# Altium PCB esp32s3.PcbDoc (part 3 of 3)
Units mm, origin at the board's own origin, x right, y up, seen from the top; angles counter-clockwise.
Board outline 131.57 x 101.6 mm, 2 copper layers (Top Layer, Bottom Layer); 173 components, 144 nets, 578 pads, 813 vias.
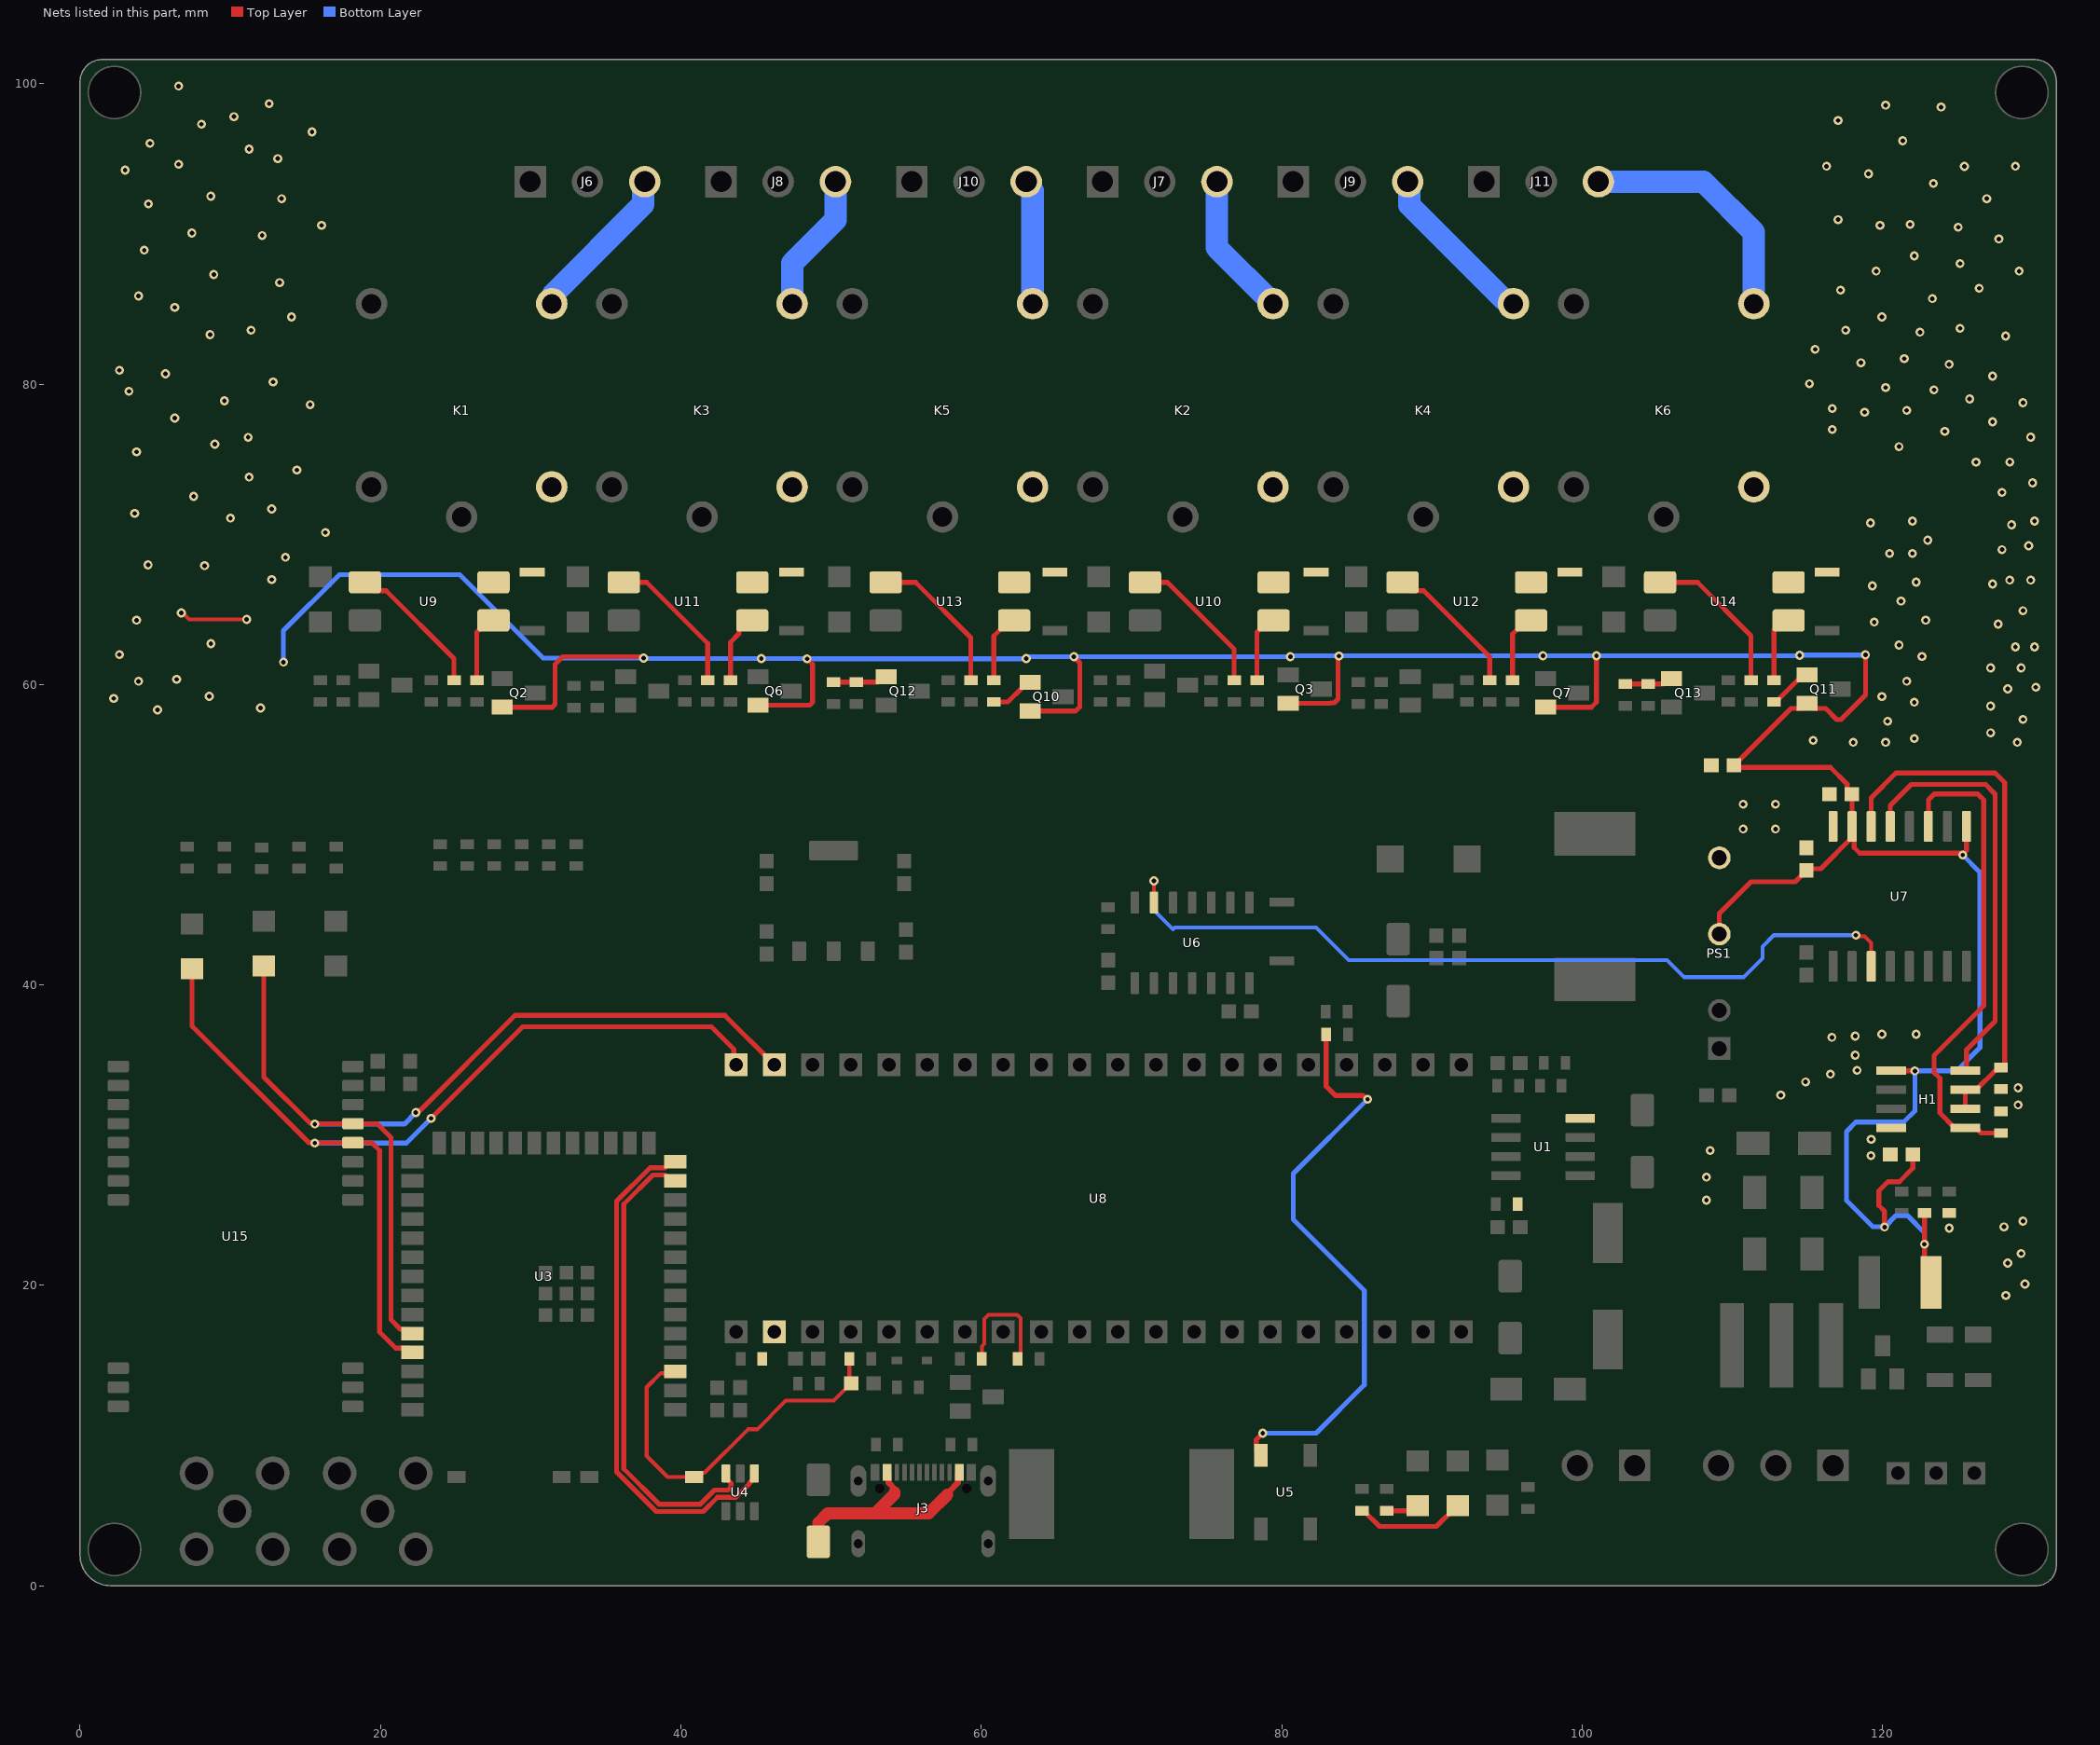
[diagram p3: the nets of this part, all layers, seen from the top]

## Via types
v1: diameter 0.6, hole 0.3, Top Layer to Bottom Layer, tented both sides, 813 vias

## Nets (pads, with @x,y where several pads share a name; then routed paths per layer and width w, separated by ;. In a path a pad name is that pad's centre, name@x,y a point inside that pad or via, vN(x,y) a via of type N, cw(c..) or ccw(c..) an arc to the next point about the centre after c; other vN are vias at no path point) (continued)
NetQ10_B: Q10.B R56.2 | length 3
  Top Layer w0.324: R56.2@60.833,58.838 61.769,58.838 62.708,59.777 62.708,59.794 63.046,60.132 Q10.B@63.246,60.132
NetQ11_B: Q11.B R57.2 | length 2.9
  Top Layer w0.324: R57.2@112.776,58.838 112.901,58.838 114.365,60.302 114.64,60.302 Q11.B@114.978,60.64
NetQ12_B: Q12.B R58.2 R60.1 | length 3.7
  Top Layer w0.324: R58.2@50.165,60.161 R60.1@51.689,60.161 53.128,60.161 53.48,60.513 Q12.B@53.68,60.513
NetQ13_B: Q13.B R59.2 R61.1 | length 3.2
  Top Layer w0.324: R59.2@102.87,60.034 R61.1@104.394,60.034 105.409,60.034 105.761,60.386 Q13.B@105.961,60.386
NetR4_2: R4.2 U1.4
NetR16_2: R16.2 R17.1 | length 8.1
  Top Layer w0.254: R17.1@60.034,15.113 60.034,15.934 60.198,16.098 60.198,17.758 60.474,18.034 62.388,18.034 62.611,17.811 62.611,15.293 R16.2@62.431,15.113
NetR23_1: R23.1 RXD.2 | length 7.4
  Top Layer w0.324: R23.1@85.344,4.99 85.469,4.99 86.522,3.937 90.308,3.937 91.685,5.314 RXD.2@91.735,5.314
NetR24_1: R24.1 TXD.2 | length 2.2
  Top Layer w0.324: R24.1@86.995,4.99 88.744,4.99 TXD.2@89.068,5.314
NetR32_2: R32.2 U9.1 | length 9.5
  Top Layer w0.324: U9.1@18.961,66.802 19.525,66.238 20.376,66.238 24.892,61.722 R32.2@24.892,60.288
NetR33_2: R33.2 U10.1 | length 9.8
  Top Layer w0.324: U10.1@70.904,66.802 72.39,66.802 76.835,62.357 R33.2@76.835,60.288
NetR36_1: R36.1 U9.3 | length 4.6
  Top Layer w0.324: R36.1@26.416,60.288 26.416,63.479 27.199,64.262 U9.3@27.521,64.262
NetR37_1: R37.1 U10.3 | length 4.6
  Top Layer w0.324: R37.1@78.359,60.288 78.359,63.479 79.142,64.262 U10.3@79.464,64.262
NetR42_2: R42.2 U11.1 | length 9.7
  Top Layer w0.324: U11.1@36.195,66.802 37.719,66.802 41.783,62.738 R42.2@41.783,60.288
NetR43_2: R43.2 U12.1 | length 9.4
  Top Layer w0.324: U12.1@88.049,66.802 88.613,66.238 89.464,66.238 93.853,61.849 R43.2@93.853,60.288
NetR46_1: R46.1 U11.3 | length 4.8
  Top Layer w0.324: R46.1@43.307,60.288 43.307,62.814 43.856,63.363 43.856,63.686 44.433,64.262 U11.3@44.755,64.262
NetR47_1: R47.1 U12.3 | length 4.7
  Top Layer w0.324: R47.1@95.377,60.288 95.377,63.352 96.287,64.262 U12.3@96.609,64.262
NetR52_2: R52.2 U13.1 | length 10
  Top Layer w0.324: U13.1@53.632,66.802 55.626,66.802 59.309,63.119 R52.2@59.309,60.288
NetR53_2: R53.2 U14.1 | length 10.5
  Top Layer w0.324: U14.1@105.194,66.802 107.696,66.802 111.252,63.246 R53.2@111.252,60.288
NetR56_1: R56.1 U13.3 | length 4.7
  Top Layer w0.324: R56.1@60.833,60.288 60.833,63.228 61.867,64.262 U13.3@62.192,64.262
NetR57_1: R57.1 U14.3 | length 4.6
  Top Layer w0.324: R57.1@112.776,60.288 112.776,63.606 113.432,64.262 U14.3@113.754,64.262
NO1: J6.3 K1.4 | length 10.7
  Bottom Layer w1.5: K1.4@31.4,85.352 31.515,85.467 31.515,85.998 37.477,91.96 37.477,93.357 J6.3@37.592,93.472
NO2: J8.3 K3.4 | length 9.3
  Bottom Layer w1.5: K3.4@47.408,85.352 47.408,88.048 50.292,90.932 J8.3@50.292,93.472
NO3: J10.3 K5.4 | length 8.3
  Bottom Layer w1.5: J10.3@62.992,93.472 62.992,93.31 63.416,92.885 K5.4@63.416,85.352
NO4: J7.3 K2.4 | length 9.7
  Bottom Layer w1.5: J7.3@75.692,93.472 75.692,89.085 K2.4@79.425,85.352
NO5: J9.3 K4.4 | length 11.2
  Bottom Layer w1.5: J9.3@88.392,93.472 88.507,93.357 88.507,91.923 94.776,85.654 94.968,85.654 95.27,85.352 K4.4@95.433,85.352
NO6: J11.3 K6.4 | length 16.5
  Bottom Layer w1.5: J11.3@101.092,93.472 108.077,93.472 111.441,90.108 K6.4@111.441,85.352
Relay_5V: C2.2 C3.2 C20.2 C22.2 D15.C D16.C D19.C D20.C D23.C D24.C H1.8 K1.2 K2.2 K3.2 K4.2 K5.2 K6.2 PS1.6 R28.2 R29.2 R31.1 U7.16 U9.4 U10.4 U11.4 U12.4 U13.4 U14.4
  other v1: 124.445,23.809 119.238,28.635 119.253,29.718 129.032,32.004 129.032,33.147 110.724,50.375 112.883,50.375 110.724,52.026 112.883,52.026
RESET: C17.2 R7.1 RESET.2 U3.3 | length 25.1
  Top Layer w0.254: U3.3@39.635,14.251 39.526,14.142 38.653,14.142 37.719,13.208 37.719,8.636 39.116,7.239 40.33,7.239 RESET.2@40.512,7.421 ; RESET.2@40.894,7.239 41.167,7.512 41.566,7.512 44.468,10.414 45.085,10.414 46.99,12.319 50.174,12.319 51.317,13.462 C17.2@51.332,13.462 51.218,13.576 R7.1@51.218,15.113
RGB_CTRL: R15.2 U5.4 | length 39.5
  Top Layer w0.324: U5.4@78.614,8.673 78.326,8.961 78.326,9.429 78.304,9.451 78.304,9.719 v1(78.74,10.154) ; R15.2@82.968,36.703 82.968,33.237 83.566,32.639 85.397,32.639 85.651,32.385 v1(85.725,32.385)
  Bottom Layer w0.324: v1(78.74,10.154) 82.29,10.154 85.506,13.37 85.506,19.65 80.772,24.384 80.772,27.432 v1(85.725,32.385)
RXD0: L_RXD.1 U3.36 U8.39 U15.23 | length 66.3
  Top Layer w0.324: L_RXD.1@12.234,41.248 12.234,33.867 15.314,30.787 15.568,30.787 v1(15.621,30.734) ; v1@15.772,30.758 U15.23@18.16,30.758 19.788,30.758 20.701,29.845 20.701,17.707 21.329,17.079 21.847,17.079 U3.36@22.135,16.791 ; v1(22.352,31.496) 22.427,31.496 22.565,31.634 22.617,31.634 28.956,37.973 42.926,37.973 U8.39@46.228,34.671
  Bottom Layer w0.324: v1(15.621,30.734) 21.59,30.734 v1(22.352,31.496)
RXD': H1.1 R29.1 U7.11 | length 32.8
  Top Layer w0.324: U7.11@123.063,50.546 123.063,52.324 123.444,52.705 126.365,52.705 126.492,52.578 126.746,52.324 126.746,38.608 123.444,35.306 123.444,34.163 123.825,33.782 123.825,31.471 124.816,30.48 H1.1@125.527,30.48 126.238,30.48 126.582,30.136 R29.1@127.889,30.136
SGND: C2.1 C3.1 C20.1 C22.1 C23.1 H1.5 PS1.4 Q2.E Q3.E Q6.E Q7.E Q10.E Q11.E R30.2 U7.9 U7.15 | length 254.9
  Top Layer w0.254: v1(6.731,64.77) 6.822,64.77 7.258,64.334 v1(11.086,64.334)
  Top Layer w0.324: Q2.E@28.11,58.486 31.433,58.486 31.623,58.676 31.623,61.341 32.131,61.849 37.465,61.849 37.465,61.802 v1(37.515,61.752) ; Q6.E@45.128,58.613 48.58,58.613 48.768,58.801 48.768,61.34 v1(48.401,61.707) ; Q10.E@63.246,58.232 66.284,58.232 66.562,58.51 66.562,61.454 v1(66.167,61.849) ; Q3.E@80.434,58.74 83.251,58.74 83.285,58.774 83.506,58.774 83.75,59.018 83.75,61.833 v1(83.812,61.895) ; Q7.E@97.579,58.486 100.617,58.486 100.956,58.825 v1(100.956,61.906) ; PS1.4@109.141,43.381 109.141,44.752 111.252,46.863 114.188,46.863 114.935,47.61 C2.1@114.935,47.625 115.038,47.728 115.891,47.728 117.983,49.821 U7.15@117.983,50.546 ; C3.1@110.109,54.61 110.236,54.483 116.539,54.483 117.648,53.374 117.648,53.013 117.956,52.705 C20.1@117.971,52.705 117.977,52.699 117.977,50.552 U7.15@117.983,50.546 ; C3.1@110.124,54.61 113.916,58.402 114.64,58.402 Q11.E@114.978,58.74 115.316,58.402 116.223,58.402 116.96,57.665 117.228,57.665 118.872,59.309 v1(118.872,61.976) ; v1(120.142,23.876) 120.142,24.929 119.761,25.31 119.761,26.289 120.365,26.893 121.127,26.893 122.023,27.789 C22.1@122.023,28.702 ; H1.5@120.599,34.29 120.608,34.281 122.152,34.281 v1(122.161,34.272) ; R30.2@122.809,24.802 122.809,20.624 C23.1@123.24,20.193 ; v1@125.222,48.768 118.491,48.768 118.121,49.138 118.121,50.408 U7.15@117.983,50.546 ; v1(125.349,48.641) 125.349,48.716 125.603,48.97 U7.9@125.603,50.546
  Bottom Layer w0.324: v1(13.539,61.483) 13.539,63.577 17.272,67.31 25.273,67.31 30.831,61.752 v1(37.515,61.752) 37.54,61.726 v1(45.35,61.726) 45.36,61.717 48.391,61.717 v1(48.401,61.707) 62.977,61.707 v1(62.992,61.722) 63.067,61.722 63.194,61.849 v1(66.167,61.849) 80.58,61.849 v1(80.581,61.848) 80.639,61.906 v1(97.4,61.906) v1(100.956,61.906) 114.456,61.906 v1(114.492,61.941) 114.509,61.959 118.855,61.959 v1(118.872,61.976) ; v1(122.798,22.735) 122.798,23.506 121.666,24.638 120.904,24.638 v1(120.142,23.876) 120.118,23.9 119.356,23.9 117.602,25.654 117.602,30.226 118.237,30.861 121.412,30.861 122.161,31.61 v1(122.161,34.272) 124.95,34.272 126.492,35.814 126.492,47.498 v1(125.349,48.641)
  other v1: 128.22,19.319 129.49,20.081 128.347,21.478 129.236,22.113 128.093,23.891 129.363,24.272 108.281,25.669 108.281,27.193 108.535,28.971 113.234,32.654 114.885,33.543 116.536,34.051 118.314,34.305 118.187,35.321 116.638,36.505 118.187,36.591 119.965,36.718 122.251,36.718 118.06,56.149 120.219,56.149 128.982,56.149 115.393,56.276 122.124,56.403 127.204,56.784 120.346,57.546 129.363,57.673 5.157,58.308 12.015,58.435 127.204,58.562 122.124,58.816 2.236,59.07 8.593,59.207 119.965,59.197 128.347,59.705 130.213,59.815 3.887,60.213 121.616,60.213 6.427,60.34 127.204,61.102 129.236,61.102 122.632,61.864 2.617,61.991 128.855,62.499 130.125,62.499 121.108,62.626 8.705,62.715 127.712,64.023 119.457,64.15 3.76,64.277 122.886,64.277 129.363,64.912 121.235,65.547 119.33,66.563 127.331,66.69 122.251,66.817 128.474,66.944 129.871,66.944 12.751,66.989 8.285,67.905 4.522,67.96 13.666,68.468 120.473,68.722 121.997,68.722 127.966,68.976 129.744,69.23 123.013,69.611 16.333,70.119 128.601,70.627 119.203,70.754 121.997,70.881 130.125,70.881 10.013,71.071 3.633,71.389 12.751,71.684 7.56,72.524 127.966,72.786 129.998,73.421 11.253,73.802 14.431,74.28 126.238,74.803 128.48,74.812 3.752,75.482 121.108,75.834 8.972,75.997 11.186,76.455 129.871,76.469 124.156,76.85 116.663,76.977 127.331,77.485 6.3,77.739 118.822,78.12 121.616,78.247 116.663,78.374 15.317,78.628 129.363,78.755 9.602,78.882 125.807,79.009 3.252,79.517 123.432,79.613 120.219,79.771 115.139,80.025 12.845,80.137 127.331,80.533 5.684,80.682 2.617,80.914 124.442,81.312 118.568,81.422 121.452,81.692 115.52,82.311 128.209,83.195 8.652,83.296 122.505,83.454 11.38,83.581 117.552,83.581 125.172,83.708 14.07,84.466 119.965,84.47 6.3,85.105 123.322,85.69 3.887,85.867 117.214,86.25 126.442,86.375 13.285,86.756 8.897,87.298 119.584,87.518 129.109,87.518 125.172,88.026 122.124,88.534 4.268,88.915 127.751,89.66 12.12,89.892 7.443,90.058 125.045,90.439 16.071,90.572 119.838,90.566 121.846,90.627 117.044,90.947 4.55,91.994 13.412,92.344 126.95,92.344 8.696,92.505 123.394,93.36 119.076,93.995 2.998,94.249 125.461,94.496 116.282,94.503 128.855,94.503 6.554,94.63 13.158,95.011 11.253,95.646 4.649,96.027 121.353,96.195 15.444,96.789 8.078,97.297 117.044,97.551 10.237,97.805 123.902,98.44 120.219,98.567 12.582,98.669 6.554,99.837
TXD0: L_TXD.1 U3.37 U8.40 U15.22 | length 67.3
  Top Layer w0.324: L_TXD.1@7.45,41.061 7.45,37.254 15.199,29.505 15.58,29.505 v1(15.621,29.464) ; v1@15.772,29.488 U15.22@18.16,29.488 19.428,29.488 19.939,28.977 19.939,16.891 21.021,15.809 21.847,15.809 U3.37@22.135,15.521 ; v1(23.368,31.115) 29.464,37.211 42.037,37.211 43.519,35.729 43.519,34.84 U8.40@43.688,34.671
  Bottom Layer w0.324: v1(15.621,29.464) 21.717,29.464 v1(23.368,31.115)
TXD1EN: U6.6 U7.3 | length 56.5
  Top Layer w0.254: v1(71.491,46.922) 71.496,46.917 71.496,45.489 U6.6@71.501,45.484 ; v1(118.237,43.307) 118.303,43.241 118.811,43.241 119.253,42.799 U7.3@119.253,41.236
  Bottom Layer w0.254: v1(71.491,46.922) 71.491,44.968 72.771,43.688 72.898,43.815 82.296,43.815 84.455,41.656 105.664,41.656 106.807,40.513 110.744,40.513 112.014,41.783 112.014,42.545 112.776,43.307 v1(118.237,43.307)
TXD': H1.4 U7.13 | length 28.5
  Top Layer w0.324: U7.13@120.523,50.546 120.523,51.943 121.92,53.34 126.873,53.34 127.508,52.705 127.508,37.592 125.603,35.687 125.603,34.366 H1.4@125.527,34.29
TXDEN': H1.2 H1.3 R28.1 U7.14 | length 35.1
  Top Layer w0.324: U7.14@119.253,50.546 119.253,52.451 120.904,54.102 127.508,54.102 128.143,53.467 128.143,34.67 127.98,34.507 R28.1@127.889,34.507 127.726,34.344 127.562,34.344 126.238,33.02 H1.3@125.527,33.02 H1.2@125.527,31.75
USB_5V: D6.A J3.A4_B9 J3.B4_A9 | length 15.9
  Top Layer w0.4: J3.A4_B9@53.734,7.544 53.834,7.444 53.834,6.844 54.229,6.449 54.229,6.223 ; 57.733,6.044 57.912,6.223 57.912,6.322 58.434,6.844 58.434,7.444 J3.B4_A9@58.534,7.544
  Top Layer w0.8: D6.A@49.149,2.921 49.149,4.191 49.784,4.826 52.959,4.826 ; 54.229,6.223 54.229,6.096 52.959,4.826 ; 57.733,6.044 56.515,4.826 52.959,4.826
USB_N: U3.13 U4.6 | length 31.7
  Top Layer w0.324: U3.13@39.635,26.951 39.335,26.951 38.939,27.347 38.142,27.347 36.195,25.4 36.195,7.78 38.55,5.425 41.295,5.425 42.237,6.367 43.142,6.367 43.331,6.556 43.331,6.829 42.992,7.168 U4.6@42.992,7.478
USB_P: U3.14 U4.4 | length 34.5
  Top Layer w0.324: U3.14@39.635,28.221 39.335,28.221 38.939,27.825 37.944,27.825 35.717,25.598 35.717,7.582 38.353,4.947 41.493,4.947 42.435,5.889 43.656,5.889 44.553,6.785 44.553,6.829 44.892,7.168 U4.4@44.892,7.478
VSYS: R26.1 U8.2
pads on no net: J2.1 J3. J3.A8 J3.B8 U5.2 U6.8 U6.9 U6.10 U6.11 U6.12 U6.13 U7.5 U7.7 U7.10 U7.12 U15.1 U15.3 U15.4 U15.5 U15.6 U15.7

## Polygon pours and split planes (outlines as drawn)
GND on Top Layer "GND_L01_P003" (solid, remove dead copper, pour order 3): 0,55.88 14.732,55.88 14.732,59.563 20.066,59.563 20.066,56.007 32.004,56.007 32.004,59.182 37.084,59.182 37.084,56.007 49.53,56.007 49.53,59.182 54.483,59.182 54.483,56.007 67.31,56.007 67.31,59.309 67.245,59.374 67.245,59.563 72.39,59.563 72.39,56.007 84.328,56.007 84.328,59.182 89.408,59.182 89.408,56.007 102.108,56.007 102.108,59.055 106.807,59.055 106.807,41.044 107.338,40.513 111.252,40.513 112.522,41.783 112.522,43.942 113.665,45.085 124.968,45.085 126.111,43.942 126.111,39.37 124.587,37.846 113.411,37.846 111.379,35.814 111.379,31.75 110.49,30.861 107.823,30.861 106.045,29.083 106.108,29.02 106.108,0.053 106.055,0 0,0 0,4.318
SGND on Top Layer "SGND_L01_P007" (solid, remove dead copper, pour order 7): 0,101.6 131.572,101.6 131.572,17.653 121.811,17.653 121.276,18.188 121.285,18.197 121.285,21.717 118.999,24.003 106.68,24.003 106.68,29.083 108.204,30.607 110.871,30.607 111.887,31.623 111.887,35.56 113.792,37.465 124.968,37.465 126.492,38.989 126.492,44.196 125.222,45.466 113.157,45.466 109.601,41.91 107.061,41.91 107.061,59.436 101.6,59.436 101.6,56.515 89.916,56.515 89.916,59.436 84.074,59.436 84.074,56.388 72.898,56.388 72.898,59.944 66.929,59.944 66.929,56.388 54.737,56.388 54.737,59.563 49.276,59.563 49.276,56.388 37.465,56.388 37.465,59.563 32.004,59.563 31.877,59.436 31.877,58.293 31.496,57.912 31.496,56.261 20.447,56.261 20.447,59.944 13.843,59.944 13.843,56.515 0,56.515
Earth on Top Layer "EARTH_L01_P000" (solid, pour order 0): 106.807,23.495 118.872,23.495 120.904,21.463 120.904,17.907 121.412,17.399 131.572,17.399 131.572,0 106.807,0
GND on Bottom Layer "GND_L02_P005" (solid, remove dead copper, pour order 5): 106.807,40.513 111.252,40.513 112.268,41.529 112.268,43.942 112.522,43.942 113.665,45.085 124.968,45.085 126.111,43.942 126.111,39.37 124.587,37.846 113.411,37.846 111.379,35.814 111.379,31.75 110.49,30.861 107.823,30.861 106.045,29.083 106.045,0.01 106.055,0 0,0 0,5.461 -0.127,5.588 0,5.715 0,55.88 14.732,55.88 14.732,59.563 20.066,59.563 20.066,56.007 32.004,56.007 32.004,59.182 37.084,59.182 37.084,56.007 49.53,56.007 49.53,59.182 54.483,59.182 54.483,56.007 67.31,56.007 67.31,59.498 67.277,59.53 67.31,59.563 72.39,59.563 72.39,56.007 84.328,56.007 84.328,59.182 89.408,59.182 89.408,56.007 102.108,56.007 102.108,59.055 106.807,59.055
SGND on Bottom Layer "SGND_L02_P011" (solid, remove dead copper, pour order 11): 0,101.6 17.272,101.6 17.272,75.311 22.479,75.311 22.479,68.834 29.083,68.834 29.083,74.549 33.147,74.549 33.147,68.072 45.466,68.072 45.466,74.549 49.149,74.549 49.149,68.199 61.468,68.199 61.468,74.549 65.278,74.549 65.278,69.469 77.724,69.469 77.724,74.549 81.153,74.549 81.153,68.199 93.98,68.199 93.98,76.073 97.282,76.073 97.282,68.199 109.728,68.199 109.728,74.549 113.538,74.549 113.538,101.6 131.572,101.6 131.572,18.415 122.809,18.415 122.301,18.923 122.301,21.717 121.539,21.717 119.507,23.749 106.807,23.749 106.68,23.876 106.68,28.829 108.077,30.226 111.379,30.226 112.649,31.496 112.649,32.893 115.824,36.068 115.824,37.211 116.586,37.973 125.095,37.973 125.73,38.608 125.73,46.99 124.587,48.133 115.458,48.133 114.823,47.498 107.95,47.498 107.95,56.642 108.077,56.769 112.903,56.769 113.284,57.15 113.284,58.42 113.256,58.42 112.748,58.928 21.844,58.928 20.574,60.198 14.097,60.198 13.716,59.817 13.716,57.023 0,57.023
Earth on Bottom Layer "EARTH_L02_P001" (solid, pour order 1): 106.847,23.495 118.872,23.495 120.904,21.463 120.904,17.907 121.412,17.399 131.572,17.399 131.572,0 106.807,0 106.847,0.04

## Keep-outs
Keep-Out Layer:
  the board outline again, w0.254

## Other copper
Top Layer:
  region net 5V: 86.36,40.132 91.694,40.132 91.694,37.338 86.36,37.338
  region net 5V: 51.943,42.926 53.213,42.926 53.467,42.672 55.499,42.672 55.499,41.529 51.943,41.529
  region net 5V: 108.077,36.576 110.109,36.576 110.617,36.068 110.617,31.623 110.236,31.242 109.601,31.242 109.22,31.623 109.22,34.036 108.458,34.036 108.077,34.417
  region net 5V: 42.799,17.78 42.799,15.494 43.688,14.605 44.45,14.605 44.45,17.78
  region net 5V: 22.479,33.909 19.177,33.909 18.923,33.655 17.399,33.655 17.399,32.893 22.479,32.893
  region net VSYS: 45.339,17.78 45.339,16.002 45.085,15.748 45.085,14.605 46.101,14.605 46.101,15.748 46.609,15.748 46.99,16.129 46.99,17.78
  region net 3V3: 109.22,59.208 109.22,57.303 111.887,57.303 111.887,59.208
  region net 3V3: 91.821,59.208 91.821,57.303 94.361,57.303 94.361,59.208
  region net 3V3: 112.776,42.926 115.951,42.926 116.586,42.291 116.967,42.291 117.094,42.164 117.094,40.132 116.332,40.132 115.824,40.64 115.824,41.402 115.697,41.402 115.443,41.656 112.776,41.656
  region net 3V3: 112.776,42.926 112.776,40.132 113.919,40.132 113.919,42.926
  region net 3V3: 74.803,59.208 74.803,57.303 77.343,57.303 77.343,59.208
  region net 3V3: 57.277,59.208 57.277,57.303 59.817,57.303 59.817,59.208
  region net 3V3: 84.582,6.985 87.757,6.985 87.757,6.096 84.582,6.096
  region net 3V3: 72.39,9.144 76.835,9.144 76.835,7.62 77.47,6.985 87.757,6.985 87.757,6.096 77.597,6.096 76.835,5.334 76.835,3.048 72.39,3.048
  region net 3V3: 77.47,40.894 77.47,37.719 83.312,37.719 83.312,38.862 79.375,38.862 78.613,39.624 78.613,40.894
  region net 3V3: 72.39,6.604 79.629,6.604 79.629,2.794 72.39,2.794
  region net 3V3: 39.751,59.208 39.751,57.303 42.291,57.303 42.291,59.208
  region net 3V3: 22.86,59.182 22.86,57.277 25.4,57.277 25.4,59.182
  region net 3V3: 54.61,17.653 54.61,15.875 54.864,15.621 54.864,14.732 53.213,14.732 53.086,14.605 52.324,14.605 52.324,15.748 52.07,16.002 50.419,16.002 50.419,17.653
  region net 3V3: 55.118,50.546 55.753,49.911 55.753,47.792 55.586,47.625 45.137,47.625 44.831,47.931 44.831,49.911 45.466,50.546
  region net 3V3: 41.275,13.462 41.783,13.97 48.26,13.97 48.26,12.827 48.133,12.7 41.656,12.7 41.402,12.446 38.862,12.446 38.862,13.462
  region net 3V3: 6.35,49.784 19.685,49.784 19.685,48.768 6.35,48.768
  pour cut-out: 17.399,76.073 17.399,101.6 113.538,101.6 113.538,75.946 112.903,75.946 112.776,76.073 107.315,76.073 107.315,69.469 103.251,69.469 103.251,76.073 91.313,76.073 91.313,69.469 87.249,69.469 87.249,76.073 75.311,76.073 75.311,69.469 71.247,69.469 71.247,76.073 59.309,76.073 59.309,69.469 55.245,69.469 55.245,76.073 43.307,76.073 43.307,69.469 39.243,69.469 39.243,76.073 27.305,76.073 27.305,69.469 23.241,69.469 23.241,76.073
  region net Relay_5V: 76.708,75.184 76.708,66.04 83.312,66.04 83.312,69.723 82.042,69.723 80.772,70.993 80.772,75.184 76.581,75.184
  region net Relay_5V: 109.347,75.057 109.347,68.961 112.395,65.913 117.856,65.913 117.856,75.057 109.601,75.057
  region net Relay_5V: 93.853,75.057 93.853,66.04 99.822,66.04 100.262,66.48 100.262,68.267 99.06,69.469 97.155,69.469 97.155,74.93 97.282,75.057
  region net Relay_5V: 60.714,74.916 60.714,68.566 60.714,65.913 65.913,65.913 65.913,74.916
  region net Relay_5V: 45.092,74.782 45.092,68.432 43.434,68.432 43.434,66.019 48.768,66.019 48.768,69.194 49.664,69.194 49.664,74.782
  region net Relay_5V: 28.702,74.803 28.702,68.453 25.908,68.453 25.908,66.04 31.369,66.04 31.369,69.215 33.274,69.215 33.274,74.803
  region net NetC1_1: 94.869,34.798 94.869,35.814 93.989,36.694 93.989,49.14 93.345,49.784 92.583,49.784 92.583,43.307 93.218,42.672 93.218,35.941 93.853,35.306 93.853,34.798
  region net NetC1_1: 94.742,34.163 94.869,34.29 94.869,35.306 93.853,35.306 93.853,32.766 94.742,32.766
  region net Relay_5V: 107.823,55.372 107.823,47.625 107.95,47.498 112.268,47.498 113.411,48.641 116.078,48.641 117.221,49.784 117.221,53.213 116.84,53.594 109.653,53.594 109.359,53.888 109.359,55.372
  region net Relay_5V: 127.381,33.401 127.508,33.528 129.921,33.528 129.921,31.115 127.381,31.115
  region net Relay_5V: 123.952,25.019 123.952,23.368 124.968,23.368 124.968,25.019
  region net Relay_5V: 121.666,30.861 118.745,30.861 118.745,27.686 120.904,27.686 121.158,27.94 121.158,29.845 121.666,29.845
  region net NetR4_2: 95.377,25.908 96.139,25.908 97.155,26.924 97.155,30.353 98.298,31.496 100.965,31.496 100.965,30.734 98.679,30.734 97.917,29.972 97.917,26.416 96.393,24.892 95.377,24.892
  region net NetC1_2: 95.377,35.56 95.377,32.639 96.103,31.913 101.056,31.913 101.219,31.75 101.219,30.48 100.965,30.226 98.933,30.226 98.933,29.464 101.092,29.464 101.981,30.353 101.981,32.004 101.473,32.512 98.171,32.512 97.663,33.02 97.663,33.97 98.171,34.478 98.171,35.56
  region net NetC1_1: 98.171,48.641 98.171,51.689 97.917,51.943 93.98,51.943 93.439,51.402 93.439,42.766 93.345,42.672 89.408,42.672 88.646,41.91 86.868,41.91 86.614,42.164 86.614,44.831 87.884,46.101 89.662,46.101 90.289,46.728 90.289,52.443 90.932,53.086 103.251,53.086 103.505,52.832 103.505,48.641
  region net NetD4_C: 98.171,41.783 98.171,37.973 102.362,33.782 102.362,29.972 105.664,29.972 105.664,38.1 104.902,38.862 103.505,38.862 103.505,41.783
  region net NetD4_C: 98.933,28.956 101.092,28.956 102.87,30.734 102.87,38.1 105.791,38.1 105.791,30.099 104.775,29.083 103.124,29.083 102.235,28.194 98.933,28.194
  region net NetC4_1: 98.806,27.686 98.806,24.13 103.378,24.13 103.378,26.035 101.727,27.686
  region net NetC4_1: 95.377,24.511 95.377,22.352 94.869,21.844 94.107,21.844 93.853,21.59 93.853,19.05 100.838,19.05 103.378,21.59 103.378,25.908 99.187,25.908 97.79,24.511 97.409,24.511
  region net NetD1_A: 93.853,18.542 93.853,12.192 97.395,8.65 97.395,7.634 98.552,6.477 101.473,6.477 101.473,9.144 100.838,9.779 99.568,9.779 96.393,12.954 96.393,18.542
  pour cut-out: 1.778,13.843 7.62,13.843 11.049,10.414 11.049,6.223 11.43,6.223 11.811,5.842 11.811,3.81 11.303,3.302 9.271,3.302 8.763,3.81 8.763,5.969 9.017,6.223 9.525,6.223 9.525,9.779 6.731,12.573 1.778,12.573
  pour cut-out: 98.044,51.462 98.044,48.514 103.632,48.514 103.632,51.435 107.061,51.435 107.088,51.462 107.088,38.962 103.888,38.962 103.861,38.989 103.632,38.989 103.632,41.91 98.044,41.91 98.044,38.989 98.017,38.962 94.588,38.962 94.588,51.462
  text "VIETTIEN" at 66.422,24.384 h1.52
Bottom Layer:
  region net 5V: 89.281,39.878 102.108,39.878 105.283,36.703 109.982,36.703 110.109,36.576 110.109,34.925 109.982,34.798 104.521,34.798 101.727,37.592 89.281,37.592
  region net 5V: 23.114,35.306 23.114,33.879 23.465,33.528 23.749,33.528 24.13,33.909 24.13,35.306 23.876,35.56 23.368,35.56
  region net 3V3: 79.883,38.862 79.883,37.719 82.296,37.719 82.296,38.862 80.01,38.862
  region net 3V3: 68.326,17.653 68.326,14.224 68.707,13.843 68.707,5.334 70.104,3.937 73.787,3.937 73.787,8.255 70.104,11.938 70.104,17.653
  region net 3V3: 22.987,58.42 22.86,58.293 22.86,57.404 22.987,57.277 112.141,57.277 112.268,57.404 112.268,58.293 112.141,58.42
  region net 3V3: 50.546,17.653 50.546,14.732 51.054,14.224 69.596,14.224 70.104,14.732 70.104,17.653 68.326,17.653 68.326,15.748 67.945,15.367 55.372,15.367 54.737,16.002 54.737,17.653 50.8,17.653
  region net 3V3: 44.958,13.716 44.958,12.954 46.863,12.954 46.863,13.716
  pour cut-out: 17.272,76.073 17.272,101.6 113.538,101.6 113.538,75.946 112.903,75.946 112.776,76.073 107.315,76.073 107.315,69.469 103.251,69.469 103.251,76.073 91.313,76.073 91.313,69.469 87.249,69.469 87.249,76.073 75.311,76.073 75.311,69.469 71.247,69.469 71.247,76.073 59.309,76.073 59.309,69.469 55.245,69.469 55.245,76.073 43.307,76.073 43.307,69.469 39.243,69.469 39.243,76.073 27.305,76.073 27.305,69.469 23.241,69.469 23.241,76.073
  region net Relay_5V: 109.728,74.422 124.841,74.422 126.238,73.025 126.238,53.594 123.698,53.594 123.698,54.483 124.206,54.991 124.206,71.247 123.571,71.882 109.728,71.882 109.728,74.676
  region net Relay_5V: 29.083,74.549 33.147,74.549 33.147,68.326 33.401,68.072 45.212,68.072 45.466,68.326 45.466,74.422 49.149,74.422 49.149,68.58 49.53,68.199 60.833,68.199 61.468,68.834 61.468,74.549 65.024,74.549 65.024,68.961 65.659,68.326 76.962,68.326 77.724,69.088 77.724,74.549 81.153,74.549 81.153,69.088 81.915,68.326 93.472,68.326 93.98,68.834 93.98,74.549 97.155,74.549 97.155,68.834 97.79,68.199 109.22,68.199 109.728,68.707 109.728,74.422 113.284,74.422 113.284,66.167 112.903,65.786 29.718,65.786 29.083,66.421
  region net Relay_5V: 107.95,47.498 107.95,54.534 108.407,54.991 128.651,54.991 129.921,53.721 129.921,29.845 127.762,29.845 127.635,29.972 127.635,52.578 126.873,53.34 114.3,53.34 113.665,52.705 113.665,47.498
  region net Relay_5V: 127.635,33.782 124.333,30.48 118.999,30.48 118.618,30.099 118.618,28.067 118.999,27.686 122.174,27.686 123.698,26.162 123.698,23.622 124.079,23.241 125.095,23.241 125.349,23.495 125.349,25.908 129.921,25.908 129.921,33.782
  pour cut-out: 1.778,13.843 7.62,13.843 11.049,10.414 11.049,6.223 11.43,6.223 11.811,5.842 11.811,3.81 11.303,3.302 9.271,3.302 8.763,3.81 8.763,5.969 9.017,6.223 9.525,6.223 9.525,9.779 6.731,12.573 1.778,12.573

## Silkscreen, mask and mechanical layers (free items; w line width, h text height)
Top Overlay:
  text "250VAC/30VDC" at 27.232,98.027 h1.52 r180
  text "RELAY ≤ 10A" at 26.436,95.995 h1.52 r180
  text "NC1" at 31.031,90.534 h1.52 r180
  text "COM1" at 35.338,90.534 h1.52 r180
  text "NO1" at 38.816,90.534 h1.52 r180
  text "NC2" at 43.947,90.534 h1.52 r180
  text "COM2" at 48.509,90.534 h1.52 r180
  text "NO2" at 51.732,90.534 h1.52 r180
  text "NC3" at 56.652,90.534 h1.52 r180
  text "COM3" at 61.213,90.534 h1.52 r180
  text "NO3" at 64.564,90.534 h1.52 r180
  text "NC4" at 69.223,90.534 h1.52 r180
  text "COM4" at 73.911,90.534 h1.52 r180
  text "NO4" at 77.135,90.534 h1.52 r180
  text "NC5" at 82.183,90.534 h1.52 r180
  text "COM5" at 86.871,90.534 h1.52 r180
  text "NO5" at 90.222,90.534 h1.52 r180
  text "NC6" at 95.006,90.534 h1.52 r180
  text "COM6" at 99.694,90.534 h1.52 r180
  text "NO6" at 102.791,90.534 h1.52 r180
  text "- GPIO1" at 24.119,52.431 h1 r90
  text "- GPIO2" at 26.053,52.431 h1 r90
  text "- GPIO41" at 27.802,52.431 h1 r90
  text "- GPIO42" at 29.58,52.431 h1 r90
  text "- GPIO45" at 31.485,52.431 h1 r90
  text "- GPIO46" at 33.263,52.431 h1 r90
  text "IO4" at 6.604,50.301 h0.8
  text "IO5" at 9.144,50.301 h0.8
  text "TXD0" at 11.303,50.301 h0.8
  text "RXD0" at 13.716,50.301 h0.8
  text "IO6" at 16.576,50.293 h0.8
  text "CH1" at 24.246,50.292 h1 r90
  text "CH2" at 26.053,50.292 h1 r90
  text "CH3" at 27.86,50.292 h1 r90
  text "CH4" at 29.667,50.292 h1 r90
  text "CH5" at 31.474,50.292 h1 r90
  text "CH6" at 33.282,50.292 h1 r90
  text "L_RX" at 11.303,46.37 h0.8
  text "L_TX" at 13.868,46.37 h0.8
  text "AUX" at 16.24,46.37 h0.8
  text "M0" at 6.731,46.368 h0.8
  text "M1" at 9.144,46.368 h0.8
  text "IO47" at 63.119,32.779 h1.2
  text "IO38" at 83.576,32.779 h1.2
  text "IO14" at 52.832,32.652 h1.2
  text "IO11" at 89.603,31.606 h1.2 r90
  text "IO12" at 91.935,31.496 h1.2 r90
  text "GND" at 49.136,31.369 h1.2 r90
  text "IO13" at 51.93,31.369 h1.2 r90
  text "IO15" at 56.883,31.369 h1.2 r90
  text "IO16" at 59.296,31.369 h1.2 r90
  text "GND" at 61.836,31.369 h1.2 r90
  text "IO48" at 66.916,31.369 h1.2 r90
  text "IO17" at 69.71,31.369 h1.2 r90
  text "IO18" at 71.869,31.369 h1.2 r90
  text "GND" at 74.663,31.369 h1.2 r90
  text "IO35" at 77.203,31.369 h1.2 r90
  text "IO36" at 79.616,31.369 h1.2 r90
  text "IO37" at 82.283,31.369 h1.2 r90
  text "GND" at 87.109,31.369 h1.2 r90
  text "TXD0" at 44.31,30.861 h1.2 r90
  text "RXD0" at 46.596,30.861 h1.2 r90
  text "3V3" at 53.074,18.174 h1.2
  text "IO10" at 55.499,18.174 h1.2
  text "IO9" at 58.166,18.174 h1.2
  text "IO8" at 63.373,18.174 h1.2
  text "IO7" at 65.913,18.174 h1.2
  text "3V3" at 68.326,18.174 h1.2
  text "IO6" at 70.866,18.174 h1.2
  text "IO5" at 76.004,18.174 h1.2
  text "IO4" at 78.613,18.174 h1.2
  text "IO3" at 88.773,18.174 h1.2
  text "VSYS" at 46.596,18.162 h1.2 r90
  text "GND" at 49.136,18.161 h1.2 r90
  text "3V3" at 51.422,18.161 h1.2 r90
  text "GND" at 61.709,18.161 h1.2 r90
  text "GND" at 74.536,18.161 h1.2 r90
  text "IO40" at 82.283,18.161 h1.2 r90
  text "IO39" at 84.696,18.161 h1.2 r90
  text "GND" at 87.236,18.161 h1.2 r90
  text "IO21" at 91.808,18.161 h1.2 r90
  text "5V" at 43.294,17.92 h1.2
  text "G" at 108.585,10.795 h1.52
  text "A+" at 112.395,10.795 h1.52
  text "B-" at 116.332,10.795 h1.52
  text "IO38" at 79.629,9.788 h0.8
  text "IO17" at 69.583,9.518 h1.2 r90
  text "IO17" at 87.978,9.532 h1.2
  text "IO18" at 90.58,9.532 h1.2
  text "+" at 99.06,9.525 h1.52
  text "-" at 102.997,9.525 h1.52
  text "120R" at 121.285,9.525 h1.52
  text "ON" at 121.158,4.445 h1
  text "OFF" at 124.714,4.445 h1
  text "POWER INPUT 7~36V" at 82.423,1.16 h1.52
  text "IO21" at 62.621,0.615 h0.8 r90
Bottom Solder:
  drawing of 18 lines, arcs and shapes, not listed
Mechanical 1:
  lines w0.254: 18.034,75.565 cw(c18.288,75.819) 18.034,76.073 23.241,76.073 23.241,69.469 27.305,69.469 27.305,76.073 32.766,76.073 cw(c32.512,75.819) 32.766,75.565 27.813,75.565 27.813,69.088 22.733,69.088 22.733,75.565 18.034,75.565 ; 34.036,75.565 cw(c34.29,75.819) 34.036,76.073 39.243,76.073 39.243,69.469 43.307,69.469 43.307,76.073 48.768,76.073 cw(c48.514,75.819) 48.768,75.565 43.815,75.565 43.815,69.088 38.735,69.088 38.735,75.565 34.036,75.565 ; 50.038,75.565 cw(c50.292,75.819) 50.038,76.073 55.245,76.073 55.245,69.469 59.309,69.469 59.309,76.073 64.77,76.073 cw(c64.516,75.819) 64.77,75.565 59.817,75.565 59.817,69.088 54.737,69.088 54.737,75.565 50.038,75.565 ; 66.04,75.565 cw(c66.294,75.819) 66.04,76.073 71.247,76.073 71.247,69.469 75.311,69.469 75.311,76.073 80.772,76.073 cw(c80.518,75.819) 80.772,75.565 75.819,75.565 75.819,69.088 70.739,69.088 70.739,75.565 66.04,75.565 ; 82.042,75.565 cw(c82.296,75.819) 82.042,76.073 87.249,76.073 87.249,69.469 91.313,69.469 91.313,76.073 96.774,76.073 cw(c96.52,75.819) 96.774,75.565 91.821,75.565 91.821,69.088 86.741,69.088 86.741,75.565 82.042,75.565 ; 98.044,75.565 cw(c98.298,75.819) 98.044,76.073 103.251,76.073 103.251,69.469 107.315,69.469 107.315,76.073 112.776,76.073 cw(c112.522,75.819) 112.776,75.565 107.823,75.565 107.823,69.088 102.743,69.088 102.743,75.565 98.044,75.565 ; 106.045,9.652 ccw(c106.362,9.97) 106.68,9.652 106.68,29.083 ccw(c106.362,28.765) 106.045,29.083 106.045,9.652